# Altium PCB Copy of ProjetFinale.PcbDoc
Units mm, origin at the board's own origin, x right, y up, seen from the top; angles counter-clockwise.
Board outline 99.95 x 99.95 mm, 2 copper layers (Top Layer, Bottom Layer); 76 components, 34 nets, 190 pads, 13 vias.
Unrouted connection lines stored in the file: 142.
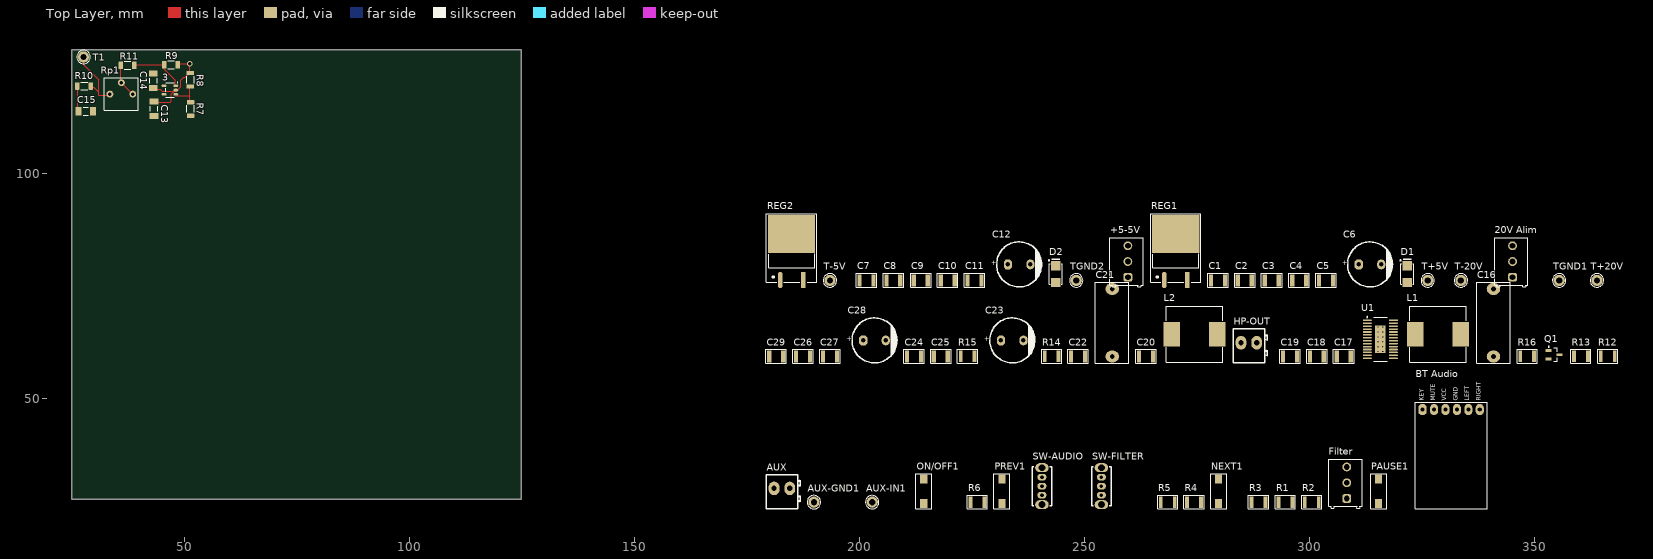
[diagram p0: Top Layer view]
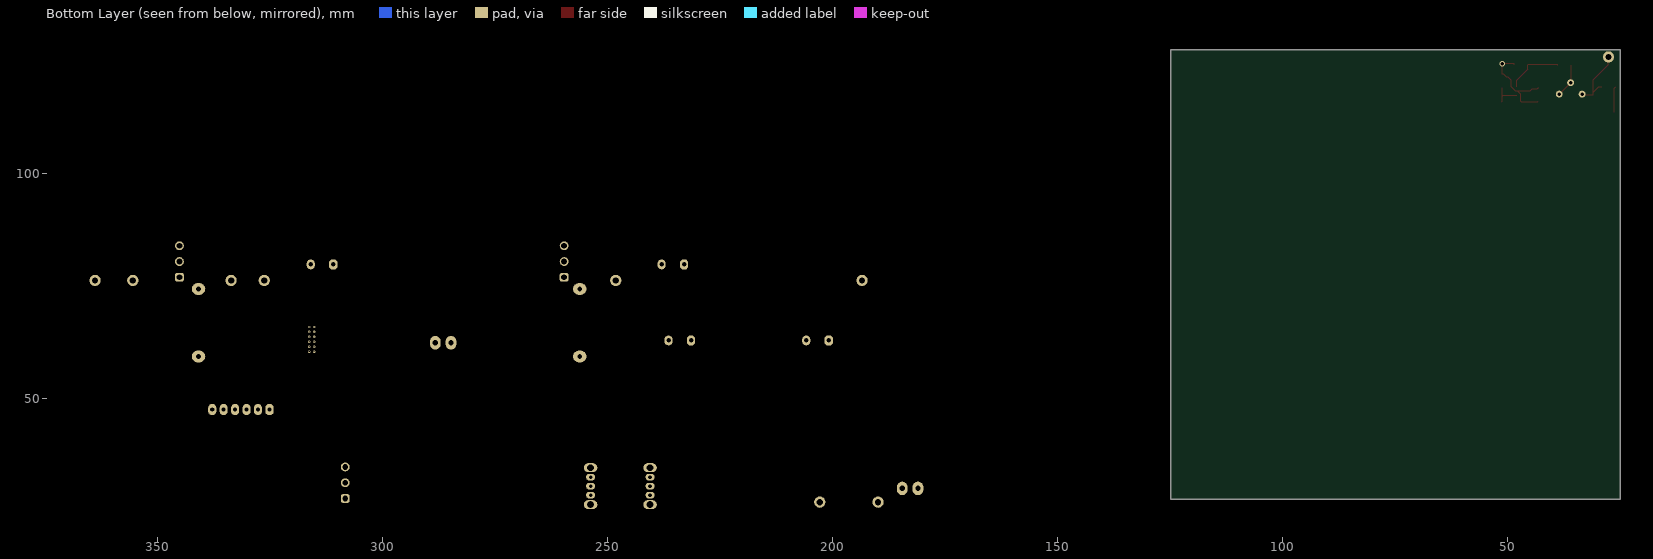
[diagram p1: Bottom Layer view, seen from below]

## Layer stack, top to bottom
Top Solder: solder mask 0.0102, Solder Resist, Dk 3.5
Top Layer: signal copper 0.0356
Dielectric 1: dielectric 0.32, FR-4, Dk 4.8
Bottom Layer: signal copper 0.0356
Bottom Solder: solder mask 0.0102, Solder Resist, Dk 3.5

## Board outline
24.892,127.635 124.841,127.635 124.841,27.686 24.892,27.686

## Design rules (kind name [scope] priority, off if disabled: settings)
Clearance [All] p1: gap=0.254 ignorepadtopadclearanceinfootprint=FALSE
PolygonConnect [All] p1: connectstyle=Relief reliefconductorwidth=0.254 reliefentries=4 polygonreliefangle="90 Angle" airgapwidth=0.254
RoomDefinition PreAmplifier [InComponentClass('PreAmplifier')] p1: confinementstyle=ConfineIn formatcopy=TRUE lockcomponents=FALSE outline 25.019,110.998 54.991,110.998 54.991,127.508 25.019,127.508
RoomDefinition "Power Supply" [InComponentClass('Power Supply')] p2: confinementstyle=ConfineIn formatcopy=TRUE lockcomponents=FALSE outline 178.943,74.422 370.078,74.422 370.078,94.107 178.943,94.107
RoomDefinition "Power Class D Amplifier" [InComponentClass('Power Class D Amplifier')] p3: confinementstyle=ConfineIn formatcopy=TRUE lockcomponents=FALSE outline 178.943,57.531 368.808,57.531 368.808,78.867 178.943,78.867
RoomDefinition Audio_In [InComponentClass('Audio_In')] p4: confinementstyle=ConfineIn formatcopy=TRUE lockcomponents=FALSE outline 178.943,25.273 339.725,25.273 339.725,56.769 178.943,56.769
RoutingVias [All] p1: holewidth=0.711 width=1.27 viastyle="Through Hole" minholewidth=0.711 minwidth=1.27 maxholewidth=0.711 maxwidth=1.27
SolderMaskExpansion [All] p1: expansion=0 istentingtop=FALSE
SupplyNets "Schematic Supply Nets_4" [InNet('+5V')] p1: voltage=0.000
SupplyNets "Schematic Supply Nets_3" [InNet('GND')] p2: voltage=0.000
SupplyNets "Schematic Supply Nets_2" [InNet('PVCC')] p3: voltage=0.000
SupplyNets "Schematic Supply Nets_1" [InNet('-5V')] p4: voltage=0.000
SupplyNets "Schematic Supply Nets" [InNet('-20V')] p5: voltage=0.000
Width [All] p1: maxlimit=0.254 minlimit=0.254 preferedwidth=0.254
30 further rules are at their usual default settings.

## Classes and differential pairs
component class PreAmplifier: 3 C13 C14 C15 R7 R8 R9 R10 R11 Rp1 T1
component class "Power Supply": "20V Alim" +5-5V C1 C2 C3 C4 C5 C6 C7 C8 C9 C10 C11 C12 D1 D2 REG1 REG2 T+5V T+20V T-5V T-20V TGND1 TGND2
component class "Power Class D Amplifier": C16 C17 C18 C19 C20 C21 C22 C23 C24 C25 C26 C27 C28 C29 HP-OUT L1 L2 Q1 R12 R13 R14 R15 R16 U1
component class Audio_In: AUX AUX-GND1 AUX-IN1 "BT Audio" Filter NEXT1 ON/OFF1 PAUSE1 PREV1 R1 R2 R3 R4 R5 R6 SW-AUDIO SW-FILTER

## Components (designator, comment, footprint, x,y, rotation, side; value= is the part's Value field where it differs from the comment)
3 "3" AOP-1671IDBVR 46.76,118.618 r180 top
"20V Alim" "val?" 691214110003 344.805,80.518 r90 top
+5-5V "val?" 691214110003 259.334,80.518 r90 top
AUX "" TS-75x70 182.753,30.099 r0 top
AUX-GND1 "" "Test Point 1.32mm" 189.865,27.051 r90 top
AUX-IN1 "" "Test Point 1.32mm" 202.819,27.051 r90 top
"BT Audio" "M18" "Bluetooth-M18 flat" 331.47,47.625 r90 top
C1 "10µF/50V" 1206-C 279.654,76.327 r0 top
C2 "1µF/50V" 1206-C 285.623,76.327 r0 top
C3 "1uF/50V" 1206-C 291.592,76.327 r0 top
C4 "10uF/50V" 1206-C 297.688,76.327 r0 top
C5 "10uF/50V" 1206-C 303.657,76.327 r0 top
C6 "220uF/50V" C100x160 313.436,79.883 r0 top
C7 "10µF/50V" 1206-C 201.549,76.327 r0 top
C8 "1µF/50V" 1206-C 207.518,76.327 r0 top
C9 "1uF/50V" 1206-C 213.614,76.327 r0 top
C10 "10uF/50V" 1206-C 219.583,76.327 r0 top
C11 "10uF/50V" 1206-C 225.552,76.327 r0 top
C12 "220uF/50V" C100x160 235.458,79.883 r0 top
C13 "1µF" CAPACITOR_1206 43.221,114.488 r270 top value=100nF
C14 "100nF" CAPACITOR_1206 43.094,120.66 r90 top
C15 "1.5 uF" CAPACITOR_1206 28.067,113.919 r180 top value=100nF
C16 "1µF/100V" C180x75 340.868,66.929 r90 top
C17 "1µF" 1206-C 307.594,59.436 r0 top
C18 "1µF" 1206-C 301.625,59.436 r0 top
C19 "470nF/50V" 1206-C 295.656,59.436 r0 top
C20 "470nF/50V" 1206-C 263.652,59.436 r0 top
C21 "1µF/100V" C180x75 256.159,66.929 r90 top
C22 "1µF/50V" 1206-C 248.539,59.436 r0 top
C23 "100uF/50V" C100x160 233.934,62.992 r0 top
C24 "1nF/50V" 1206-C 212.09,59.436 r0 top
C25 "0.1µF/50V" 1206-C 218.059,59.436 r0 top
C26 "1nF/50V" 1206-C 187.452,59.436 r0 top
C27 "0.1µF/50V" 1206-C 193.421,59.436 r0 top
C28 "100uF/50V" C100x160 203.327,62.992 r0 top
C29 "1µF/50V" 1206-C 181.483,59.436 r0 top
D1 "RS1A" DO-214AC 321.691,77.724 r90 top
D2 "RS1A" DO-214AC 243.586,77.724 r90 top
Filter "val?" 691214110003 307.975,31.369 r90 top
HP-OUT "" TS-75x70 286.512,62.484 r0 top
L1 "33µH" SRR1260 328.549,64.389 r0 top
L2 "33µH" SRR1260 274.447,64.389 r0 top
NEXT1 "" TackS-35X60 279.781,29.464 r90 top
ON/OFF1 "" TackS-35X60 214.249,29.464 r90 top
PAUSE1 "" TackS-35X60 315.341,29.464 r90 top
PREV1 "" TackS-35X60 231.648,29.464 r90 top
Q1 "2N7002" INF-PG-SOT23_M 354.33,59.817 r0 top
R1 "51k" 1206-R 294.64,27.051 r0 top
R2 "10kR" 1206-R 300.482,27.051 r0 top
R3 "10kR" 1206-R 288.671,27.051 r0 top
R4 "33kR" 1206-R 274.32,27.051 r0 top
R5 "10kR" 1206-R 268.478,27.051 r0 top
R6 "9.1kR" 1206-R 226.187,27.051 r0 top
R7 "10k  Ω" RESISTOR_1206 51.349,114.437 r270 top
R8 "10k  Ω" RESISTOR_1206 51.308,120.904 r270 top
R9 "47k  Ω" RESISTOR_1206 46.99,124.257 r180 top
R10 "1k  Ω" RESISTOR_1206 27.686,119.507 r0 top
R11 "10k  Ω" RESISTOR_1206 37.338,124.13 r0 top
R12 "100k" 1206-R 366.268,59.436 r0 top
R13 "1kR" 1206-R 360.299,59.436 r0 top
R14 "100kR" 1206-R 242.697,59.436 r0 top
R15 "10R" 1206-R 224.028,59.436 r0 top
R16 "100k" 1206-R 348.361,59.436 r0 top
REG1 "MC7805" D2PAK254P1420X457-3N 270.256,82.677 r90 top
REG2 "MC7905" D2PAK254P1420X457-3N 184.912,82.677 r90 top
Rp1 "10k" 3362P 35.965,117.729 r0 top
SW-AUDIO "" SPDT-OS102011MS2QN1 240.538,30.607 r90 top
SW-FILTER "" SPDT-OS102011MS2QN1 253.746,30.607 r90 top
T1 "Pram_In" "Test Point 1.32mm" 27.559,125.984 r0 top (schematic designator T?)
T+5V "" "Test Point 1.32mm" 326.263,76.327 r90 top
T+20V "" "Test Point 1.32mm" 363.855,76.327 r90 top
T-5V "" "Test Point 1.32mm" 193.421,76.327 r90 top
T-20V "" "Test Point 1.32mm" 333.629,76.327 r90 top
TGND1 "" "Test Point 1.32mm" 355.473,76.327 r90 top
TGND2 "" "Test Point 1.32mm" 248.158,76.327 r90 top
U1 "TP3111D1" TI-PWP28-5720X1950TP_M 315.722,63.246 r0 top

## Footprints (in the part's own frame and the unit in brackets; to place one, negate y for a bottom-side part, rotate by r counter-clockwise, add the part's x,y. Pads: shape width x height; smd on the part's side, far side on the other; paste and mask are expansions set on the pad)
1206-C [mm] "Chip Capacitor, 2-Leads, Body 3,20x2,50mm, IPC Medium Density"
  rect 0.95x2.65 smd: 1(-1.55,0) 2(1.55,0)
  silkscreen extent -2.29,-1.55 2.29,1.6, body extent -1.6,-1.25 1.6,1.25, height 0.55
1206-R [mm] "Chip Resistor, 2-Leads, Body 3,20x2,50mm, IPC Medium Density"
  rect 0.85x2.55 smd: 1(-1.55,0) 2(1.55,0)
  silkscreen extent -2.26,-1.5 2.24,1.55, body extent -1.6,-1.25 1.6,1.25, height 0.55
3362P [mil] "3362 - 1/4 ” Square Trimpot® Trimming Potentiometer"
  round 60 hole 30: 1(-100,0) 2(0,100) 3(100,0)
  silkscreen extent -148,-143 148,144, body extent -130,-130 130,130, height 189
691214110003 [mm] "3.50 mm Horizontal Entry Modular, 3p"
  rrect50% 1.95x1.95 hole 1.3: 1(-3.5,-0.3)
  round 1.95 hole 1.3: 2(0,-0.3) 3(3.5,-0.3)
  silkscreen extent -5.65,-3.7 5.25,3.7, body extent -5.7,-3.7 5.25,3.7, height 8.55
AOP-1671IDBVR [mm]
  oval 1.1x0.6 smd: 1(-1.3,-0.95) 2(-1.3,0) 3(-1.3,0.95) 4(1.3,0.95) 5(1.3,-0.95)
  silkscreen extent -1.79,-1.76 0.94,1.59, body extent -0.87,-1.53 0.87,1.52, height 1.45
"Bluetooth-M18 flat" [mm]
  oct 2.5x1.8 hole 0.9: 1(0,6.35)
  oval 2.5x1.8 hole 0.9: 2(0,3.81) 3(0,1.27) 4(0,-1.27) 5(0,-3.81) 6(0,-6.35)
  silkscreen extent -22,-8 1.65,8
C100x160 [mm] "10mmx16mm-pitch5mm"
  oct 1.8x2.2 hole 1: 1(-2.5,0)
  oval 1.8x2.2 hole 1: 2(2.5,0)
  silkscreen extent -5,-5 5.08,5, body extent -5.03,-5.03 5.03,5.03, height 16.53
C180x75 [mm] "spacing 15mm"
  oval 2.6x3 hole 1.1: 1(-7.5,0) 2(7.5,0)
  silkscreen extent -9,-3.71 9,3.75, body extent -9,-3.75 9,3.75, height 12
CAPACITOR_1206 [mm] "Chip Capacitor, Body 3.2x1.6mm, Height 1.7mm, IPC Low Density"
  rect 1.35x1.9 smd: 1(-1.6,0) 2(1.6,0)
  silkscreen extent -0.55,-0.85 0.55,0.85, body extent -1.7,-0.9 1.7,0.9, height 1.7
D2PAK254P1420X457-3N [mm] "D2-PAK, 3-Pads, Body 7,78x8,48mm (max), IPC Medium Density"
  oct 3.5x1.016 smd: 1(-6.265,2.54)
  rect 3.5x1.016 smd: 3(-6.265,-2.54)
  rect 8.38x10.49 smd: 4(3.95,0)
  silkscreen extent -6.73,-5.59 8.51,5.59, body extent -6.71,-5.13 7.48,5.13, height 5.03
DO-214AC [mm] "Molded Diode, 2-Leads, Body 4,30x2,70mm, IPC Medium Density"
  rect 2.07x2.06 smd: 1(-1.875,0) 2(1.875,0)
  silkscreen extent -2.3,-1.45 3.3,1.6, body extent -2.52,-1.45 2.52,1.45, height 2.44
INF-PG-SOT23_M [mm] "SOT23, 3-Leads, Body 2.9x1.3mm, Pitch 0.95mm, IPC Low Density"
  rect 1.35x0.6 smd: 1(-1.2,0.95) 2(-1.2,-0.95) 3(1.2,0)
  silkscreen extent -1.32,-1.5 0.7,1.92, body extent -0.7,-1.5 0.7,1.5, height 1.1
RESISTOR_1206 [mm]
  rrect25% 0.95x1.65 smd: 1(-1.5,0) 2(1.5,0)
  silkscreen extent -0.76,-0.86 0.76,0.86, body extent -1.6,-0.8 1.6,0.8, height 0.55
SPDT-OS102011MS2QN1 [mm]
  oval 1.5x2 hole 0.8: 1(-2,0) 2(0,0) 3(2,0)
  oval 2x3 hole 1.5: 4(-4.1,0) 4(4.1,0)
  silkscreen extent -4.32,-2.15 4.32,2.15, body extent -4.3,-2.15 4.3,2.15, height 8
SRR1260 [mm] "Precision Wire Wound Inductor, 2-Leads, Body 12,50x12,50mm, IPC Medium Density"
  rect 3.65x5.4 smd: 1(-5.075,0) 2(5.075,0)
  silkscreen extent -6.25,-6.25 6.25,6.25, body extent -6.35,-6.25 6.35,6.25, height 6.1
TackS-35X60 [mm] "tack switch 3.5mmx6mm"
  rect 2x1.6 smd: 1(-2.7,0) 2(2.7,0)
  silkscreen extent -3.89,-1.78 3.91,1.78, body extent -3.6,-1.75 3.6,1.75, height 5
"Test Point 1.32mm" [mm] "VERO  20-2136"
  round 2.5 hole 1.4: 1(0,0)
  silkscreen extent -1.5,-1.5 1.5,1.5, body extent -1.27,-1.27 1.27,1.27, height 4.57
TI-PWP28-5720X1950TP_M [mm] "SOP, 28-Leads, Body 9.8x4.5mm, Pitch 0.65mm, Thermal Pad 6.17x2.4mm, IPC Low Density"
  oval 2x0.35 smd: 1(-2.9,4.225) 2(-2.9,3.575) 3(-2.9,2.925) 4(-2.9,2.275) 5(-2.9,1.625) 6(-2.9,0.975) 7(-2.9,0.325) 8(-2.9,-0.325) 9(-2.9,-0.975) 10(-2.9,-1.625) 11(-2.9,-2.275) 12(-2.9,-2.925) 13(-2.9,-3.575) 14(-2.9,-4.225) 15(2.9,-4.225) 16(2.9,-3.575) 17(2.9,-2.925) 18(2.9,-2.275) 19(2.9,-1.625) 20(2.9,-0.975) 21(2.9,-0.325) 22(2.9,0.325) 23(2.9,0.975) 24(2.9,1.625) 25(2.9,2.275) 26(2.9,2.925) 27(2.9,3.575) 28(2.9,4.225)
  rect 2.4x6.17 smd: 29(0,0)
  silkscreen extent -3.02,-4.9 1.5,5.07, body extent -2.25,-4.9 2.25,4.9, height 1.2
TS-75x70 [mm] "pitch 3.5mm"
  oval 2.4x3 hole 1.2: 1(-1.75,0) 2(1.75,0)
  silkscreen extent -3.5,-4.5 4.09,3.05, body extent -3.58,-4.5 4.12,3.05, height 9.15

## Part data
3: library part OPA1671DBVT, "AOP"
"20V Alim" +5-5V Filter: library part "Screw Terminal 3x", Manufacturer=WE, Manufacturer Part Number=691-214110-003, Supplier Part Number=710-691214110003, MOQ=1, Supplier=mouser, Supplier Unit Price=1.16
AUX HP-OUT: library part Connector-2, "Fixed Terminal Blocks PT 1.5/2-3.5H 2POS HRZ 3.5mm SCREW", Manufacturer="Phoenix Contact", Manufacturer Part Number=1984617, Supplier Part Number=651-1984617, MOQ=1, Supplier=Mouser, Supplier Unit Price=0.55
AUX-GND1 AUX-IN1 T1 T+5V T+20V T-5V T-20V TGND1 TGND2: library part "Test Point", "PCB Test Point, Type 8 Series, Black, Through Hole Mount, 1.32 mm, Phosphor Bronze", Manufacturer=VERO, Manufacturer Part Number=20-2136, Supplier Part Number=8731195, MOQ=100, Supplier=Farnell, Supplier Unit Price=0.132
"BT Audio": library part M18-Bluetooth, "BLUETOOTH AUDIO TRANSFER MODULE"
C1 C2 C3 C4 C5 C7 C8 C9 C10 C11 C17 C18 C19 C20 C22 C24 C25 C26 C27 C29: library part Capacitor-NP
C6 C12 C23 C28: library part Capacitor-Pol
C13 C14 C15: library part Capacitor, "Capacitor", Case-EIA=1206, Case-Metric=3216, Rated Voltage="100 V", Tolerance=Â±5%, Max Thickness="1.7 mm", Technology=SMT
C16 C21: library part Capacitor-NP, "Film Capacitor", Manufacturer=KEMET, Manufacturer Part Number=SMR15105J100B06L16.5CBULK, Supplier Part Number=80-SMR15105J100B0616, MOQ=1, Supplier=Mouser, Supplier Unit Price=4.3
D1 D2: library part Diode, "Clamp Diode 1A 1.1 V  / RS1A", Manufacturer=ONSEMI, Supplier Part Number=512-RS1A, Manufacturer Part Number=RS1A, MOQ=1, Supplier=Mouser, Supplier Unit Price=0.372
L1 L2: library part Inductor, "Fixed Inductors 33µH 20% SMD 1260", Manufacturer=Bourns, Manufacturer Part Number=SRR1260A-330M, Supplier Part Number=652-SRR1260A-330M, MOQ=1, Supplier=Mouser, Supplier Unit Price=0.791
NEXT1 ON/OFF1 PAUSE1 PREV1: library part "TackSwitch Simple", Manufacturer="MULTICOMP PRO", Manufacturer Part Number=DTSM-32S-B, Supplier Part Number=9471898, MOQ=10, Supplier=Farnell, Supplier Unit Price=0.188
Q1: library part 2N7002HW, "N-Channel Mosfet 1.75 V VGSth", Manufacturer=Diotec, Supplier Part Number=637-2N7002, Manufacturer Part Number=2N7002, MOQ=1, Supplier=Mouser, Supplier Unit Price=0.27
R1 R2 R3 R4 R5 R6 R12 R13 R14 R15 R16: library part Resistor
R7 R8 R9 R10 R11: library part Resistor, "Résistance"
REG1: library part MC7800, "Voltage Regulators –Positive-1.0 A - 5V", Manufacturer=onsemi, Manufacturer Part Number=MC7805BD2TR4G, Supplier Part Number=863-MC7805BD2TR4G, MOQ=1, Supplier=Mouser, Supplier Unit Price=0.90
REG2: library part MC7900, "Voltage Regulators –Negative-1.0 A", Manufacturer=onsemi, Manufacturer Part Number=MC7905ACD2TR4G, Supplier Part Number=863-MC7905ACD2TR4G, MOQ=1, Supplier=Mouser, Supplier Unit Price=0.809
Rp1: library part Potentiometer, "Potentiometer"
SW-AUDIO SW-FILTER: library part SPDT, "Slide Switches SPDT On-On", Manufacturer=C&K, Manufacturer Part Number=OS102011MS2QN1, Supplier Part Number=611-OS102011MS2QN1, MOQ=1, Supplier=Mouser, Supplier Unit Price=0.39
U1: library part TPA3111D1, Manufacturer=TI, Manufacturer Part Number=TPA3111D1PWP, Supplier Part Number=595-TPA3111D1PWP, MOQ=1, Supplier=Mouser, Supplier Unit Price=2.4

## Via types
v1: diameter 0.5, hole 0.2, Top Layer to Bottom Layer, 12 vias
v2: diameter 1.27, hole 0.711, Top Layer to Bottom Layer, 1 vias

## Nets (pads, with @x,y where several pads share a name; then routed paths per layer and width w, separated by ;. In a path a pad name is that pad's centre, name@x,y a point inside that pad or via, vN(x,y) a via of type N, cw(c..) or ccw(c..) an arc to the next point about the centre after c; other vN are vias at no path point)
+5V: 3.5 "BT Audio.3" +5-5V.1 C3.2 C4.2 C5.2 C6.1 C13.2 C14.2 D1.2 R7.2 REG1.3 T+5V.1
-5V: +5-5V.3 C9.1 C10.1 C11.1 C12.2 D2.1 REG2.3 T-5V.1
-20V: "20V Alim.1" C7.1 C8.1 REG2.4 T-20V.1
/SD: R12.1 R13.2 U1.1 U1.2
AUX-OUT: AUX-IN1.1 AUX.1 SW-AUDIO.3
BT-L: "BT Audio.5" R2.1
BT-OUT: R2.2 R3.2 R5.2 SW-AUDIO.1
BT-R: "BT Audio.6" R3.1
GND: 3.2 "20V Alim.2" "BT Audio.4" +5-5V.2 AUX-GND1.1 AUX.2 C1.1 C2.1 C3.1 C4.1 C5.1 C6.2 C7.2 C8.2 C9.2 C10.2 C11.2 C12.1 C13.1 C14.1 C16.2 C18.1 C21.1 C22.2 C23.2 C24.2 C25.2 C26.1 C27.1 C28.2 C29.1 D1.1 D2.2 Filter.2 NEXT1.1 ON/OFF1.1 PAUSE1.1 PREV1.1 Q1.2 R5.1 R8.1 R9.1 R16.1 REG1.4 REG2.1 SW-AUDIO.4 SW-FILTER.4 TGND1.1 TGND2.1 U1.3 U1.4 U1.5 U1.6 U1.8 U1.19 U1.24 U1.29 | length 22.5
  Top Layer w0.254: C14.1 43.221,119.06 43.485,118.796 44.638,118.796 45.07,118.364 3.2@47.67,118.364 ; C13.1 43.409,115.9 46.812,115.9 47.002,116.09 47.002,117.696 3.2@47.67,118.364 ; R9.1 48.49,124.46 v2(51.181,124.46) 51.181,122.15 50.831,122.15 50.186,121.505 49.877,121.505 49.213,120.841 49.213,119.381 48.38,118.548 48.196,118.364 47.933,118.364 3.2@47.67,118.364
  other v1: 315.172,60.496 316.272,60.496 315.172,61.596 316.272,61.596 315.172,62.696 316.272,62.696 315.172,63.796 316.272,63.796 315.172,64.896 316.272,64.896 315.172,65.996 316.272,65.996
GVDD: C29.2 U1.9 U1.10
HP+: C16.1 HP-OUT.1 L1.2
HP-: C21.2 HP-OUT.2 L2.2
KEY: "BT Audio.1" ON/OFF1.2 R1.2 R4.2 R6.2
"NetBT Audio_2": "BT Audio.2" Q1.1 R16.2
NetC15_1: C15.1 SW-FILTER.2
NetC17_2: C17.2 U1.12
NetC18_2: C18.2 U1.11
NetC19_1: C19.1 U1.17 U1.21
NetC19_2: C19.2 L1.1 U1.18 U1.20
NetC20_1: C20.1 U1.22 U1.26
NetC20_2: C20.2 L2.1 U1.23 U1.25
NetC22_1: C22.1 R14.2 R15.2 U1.7
NetFilter_1: Filter.1 SW-FILTER.1
NetFilter_3: Filter.3 SW-AUDIO.2 SW-FILTER.3
NetNEXT1_2: NEXT1.2 R4.1
NetPAUSE1_2: PAUSE1.2 R1.1
NetPREV1_2: PREV1.2 R6.1
NetQ1_3: Q1.3 R13.1
NetR10_2: R10.2 Rp1.1 T1.1 | length 14.4
  Top Layer w0.254: T1.1@27.432,125.73 27.644,125.518 27.644,124.248 30.944,120.948 30.944,118.154 ; R10.2@29.059,119.253 29.845,119.253 30.944,118.154 ; Rp1.1@33.298,117.475 30.944,117.475 30.944,118.154
OPA+: 3.3 R7.1 R8.2 | length 6.7
  Top Layer w0.254: 3.3@47.933,117.414 51.049,117.414 51.181,117.282 ; R8.2@51.181,119.15 51.181,117.282 ; R7.1 51.308,115.978 51.181,115.978 51.181,117.282
OPA-: 3.4 R11.1 Rp1.2 Rp1.3 | length 7.5
  Top Layer w0.254: R11.1 35.862,124.106 Rp1.2@35.862,120.269 ; Rp1.2 Rp1.3
OPA-Audio-IN: C15.2 R10.1 | length 5.7
  Top Layer w0.254: R10.1@26.059,119.253 26.313,118.999 26.313,113.692 C15.2@26.34,113.665
OUT_5V: 3.1 C17.1 R9.2 R11.2 | length 12.6
  Top Layer w0.254: R11.2 38.838,124.3 R9.2@45.363,124.3 ; R9.2 45.507,124.24 45.507,123.2 47.933,120.774 47.933,119.568 3.1@47.933,119.314
PVCC: "20V Alim.3" C1.2 C2.2 C23.1 C24.1 C25.1 C26.2 C27.2 C28.1 R12.2 R14.1 R15.1 REG1.1 T+20V.1 U1.14 U1.15 U1.16 U1.27 U1.28
pads on no net: U1.13

## Text inside footprints (layer, text, board x,y; h text height)
"BT Audio": Top Overlay "KEY" at 325.681,49.594 h1.6 r90; Top Overlay "MUTE" at 328.212,49.594 h1.6 r90; Top Overlay "VCC" at 330.759,49.594 h1.6 r90; Top Overlay "GND" at 333.299,49.594 h1.6 r90; Top Overlay "LEFT" at 335.841,49.594 h1.6 r90; Top Overlay "RIGHT" at 338.379,49.594 h1.6 r90
C6: Top Overlay "+" at 307.213,79.272 h1.8
C12: Top Overlay "+" at 229.235,79.272 h1.8
C23: Top Overlay "+" at 227.711,62.381 h1.8
C28: Top Overlay "+" at 197.104,62.381 h1.8